# Altium PCB CM3_Board.PcbDoc
Units mm, origin at the board's own origin, x right, y up, seen from the top; angles counter-clockwise.
Board outline 80.15 x 57.15 mm, 4 copper layers (Component Side, Ground Plane, Power Plane, Solder Side), stack 1.717 mm thick; 83 components, 65 nets, 480 pads, 0 vias.
Unrouted connection lines stored in the file: 344.
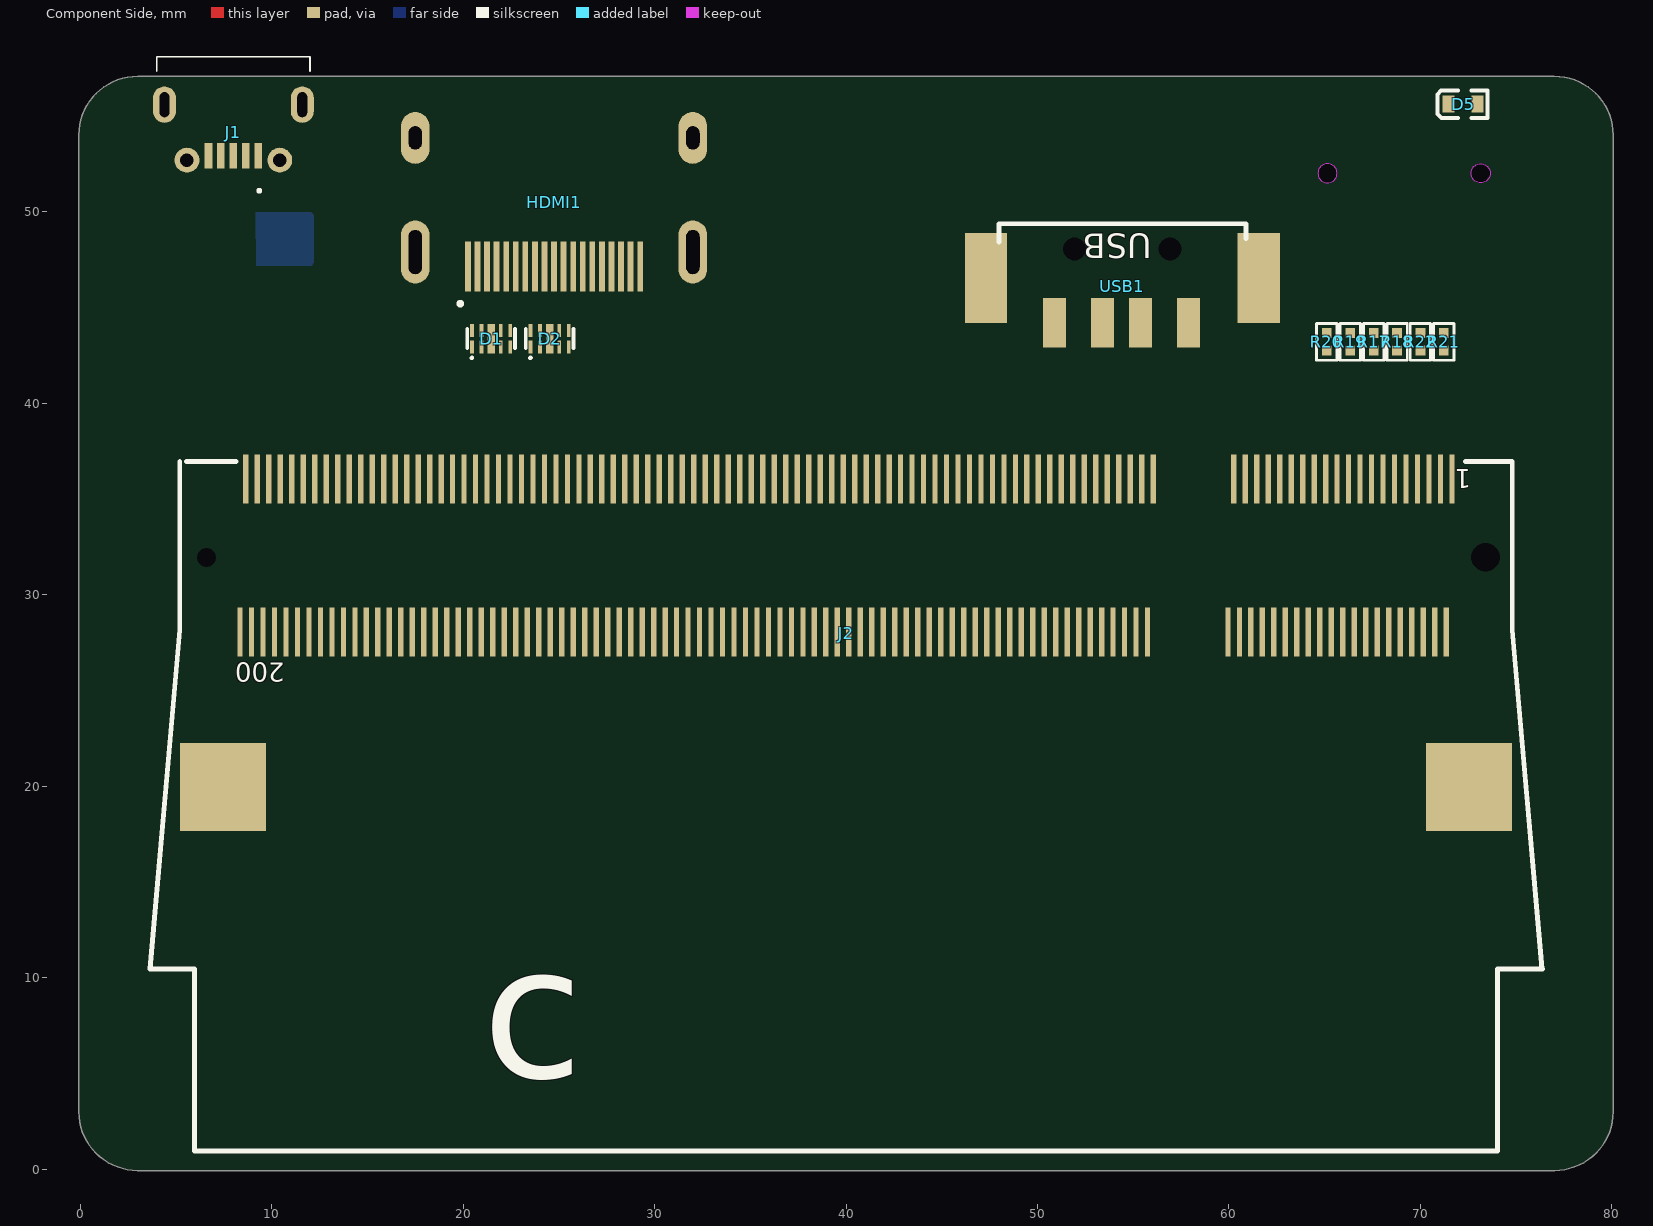
[diagram p0: Component Side view]
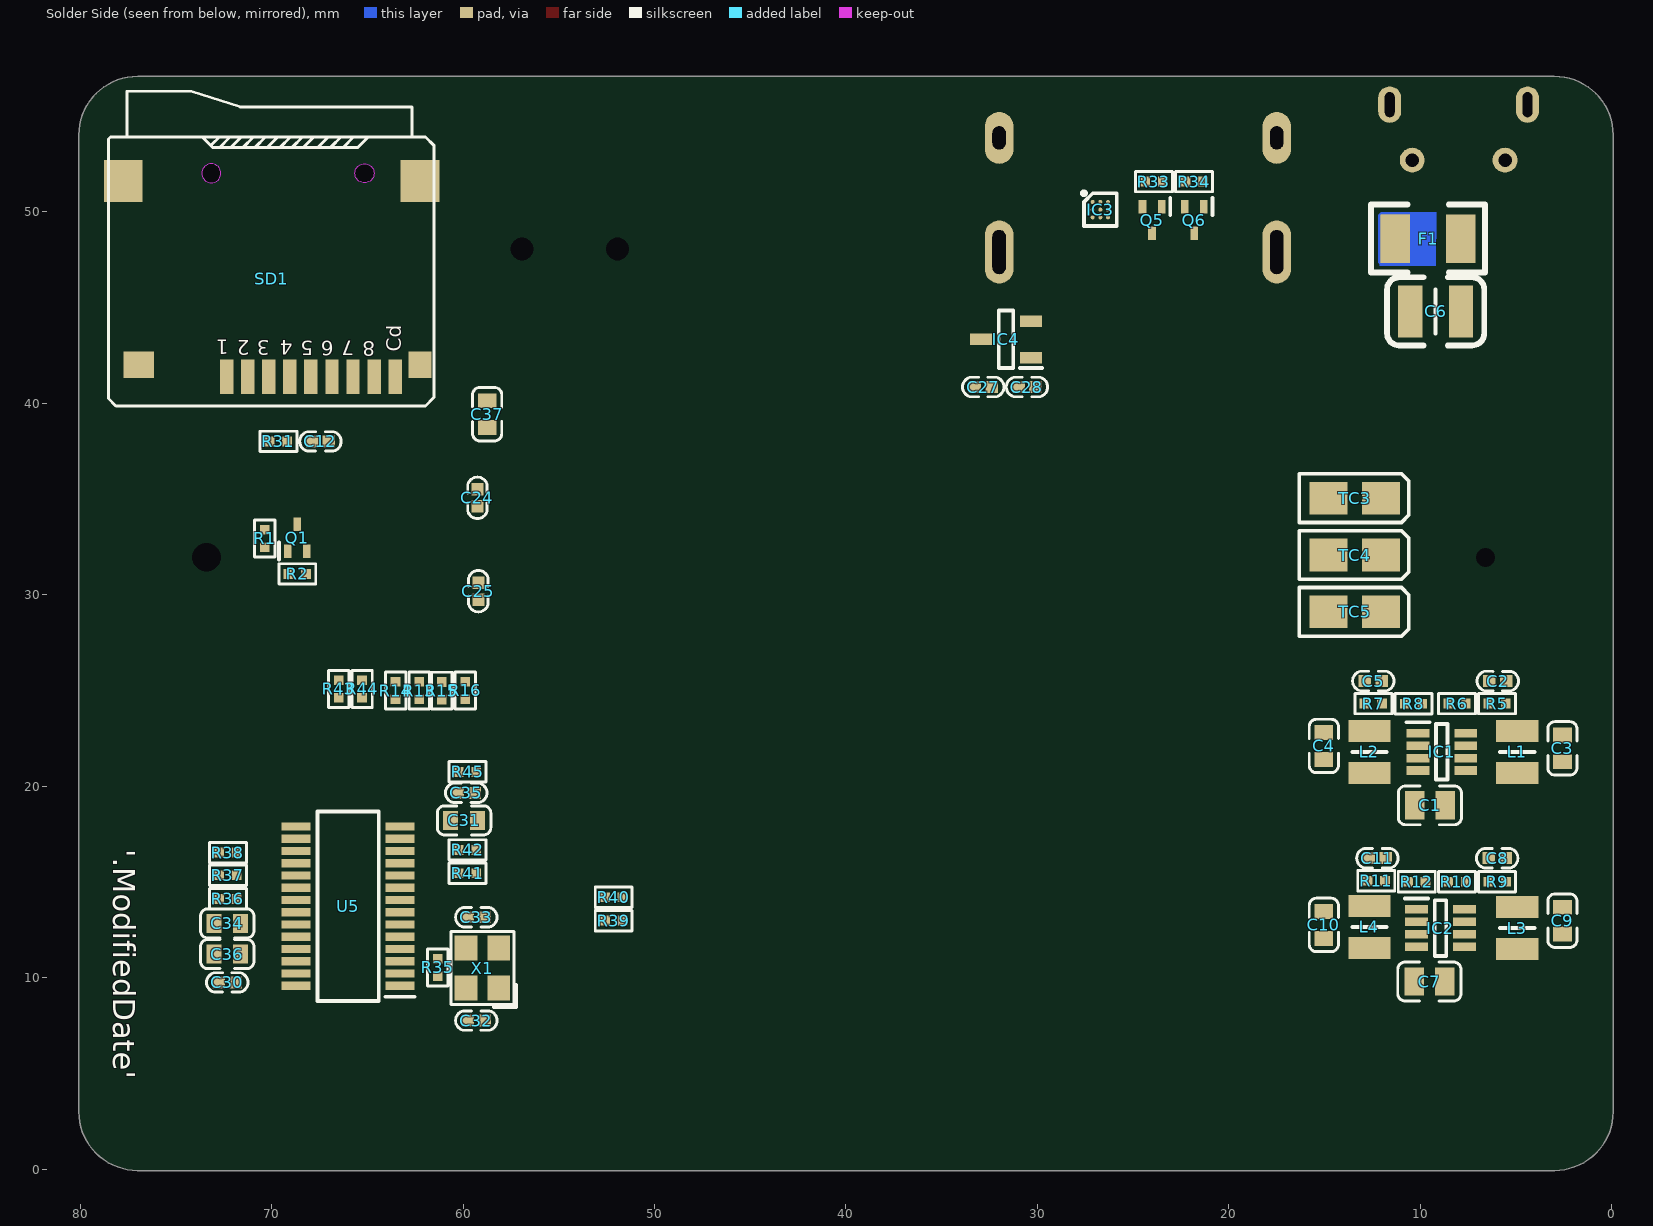
[diagram p1: Solder Side view, seen from below]
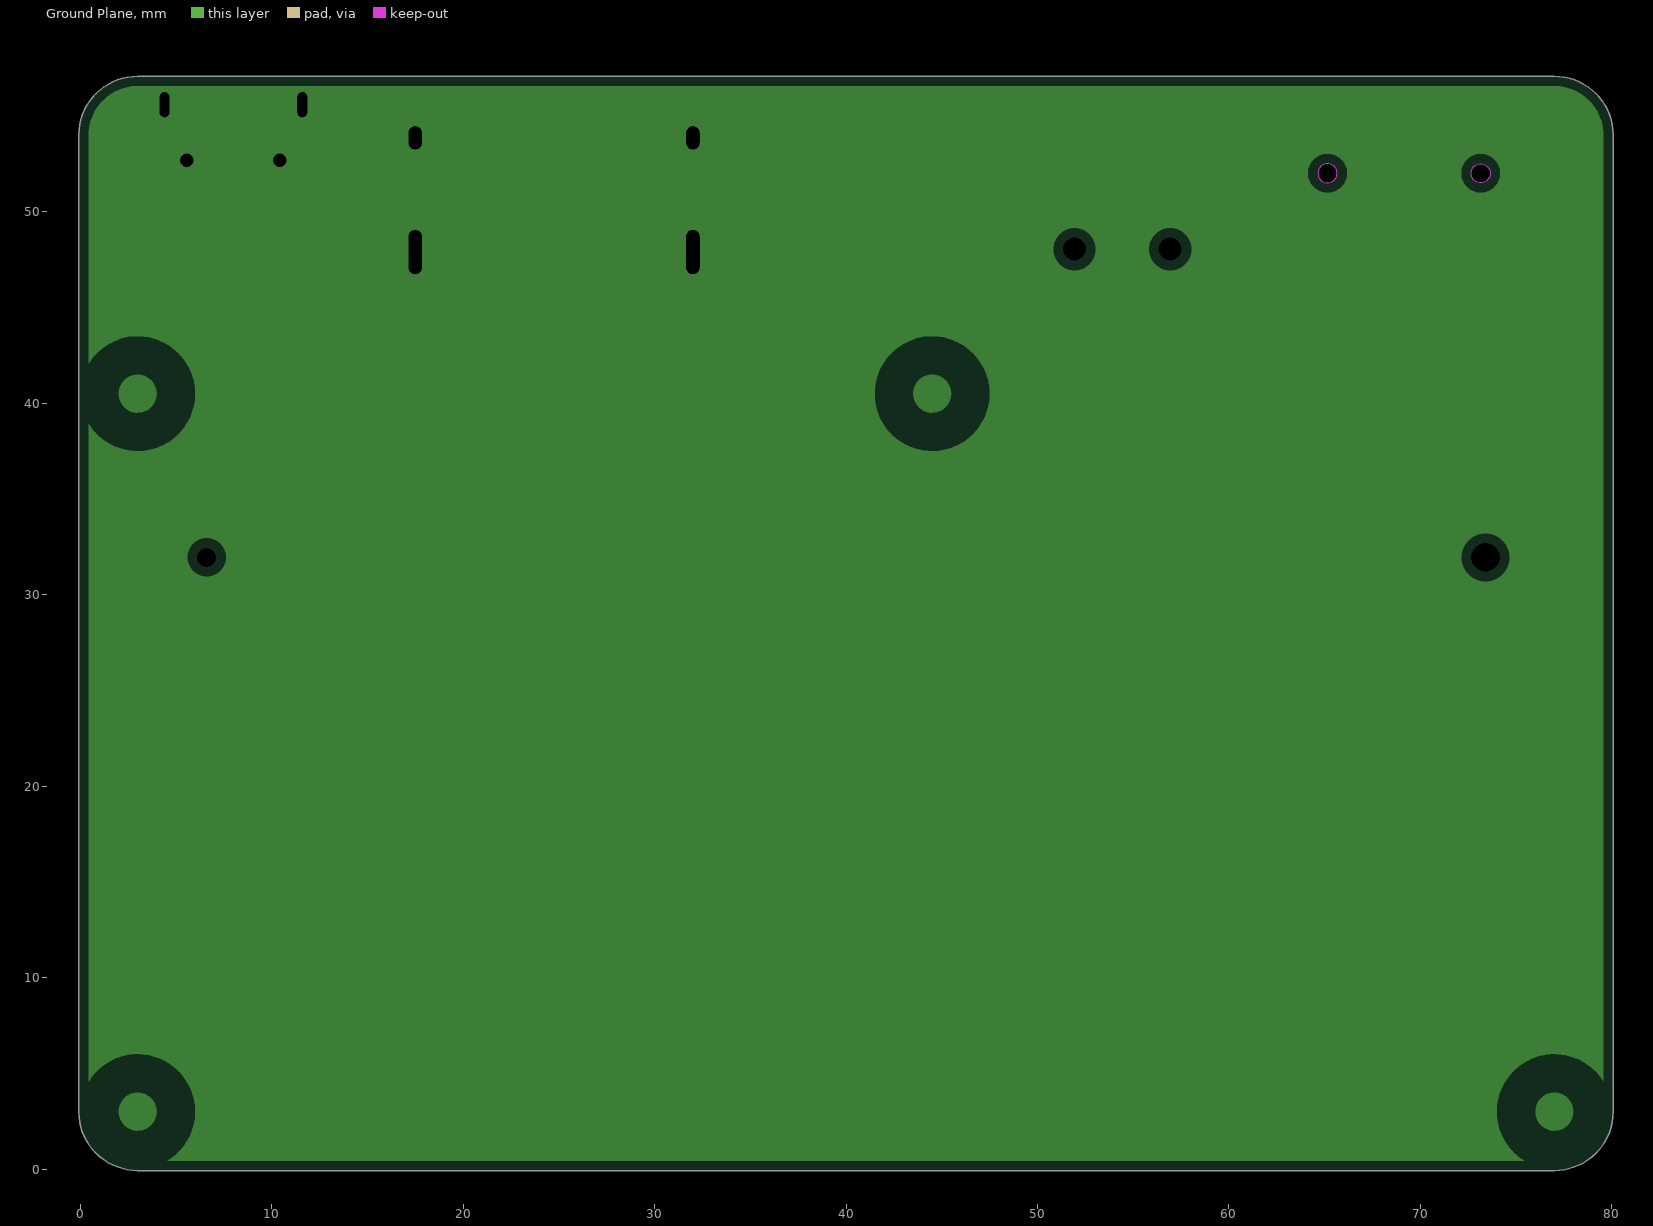
[diagram p2: Ground Plane, clearances drawn from the general rule]
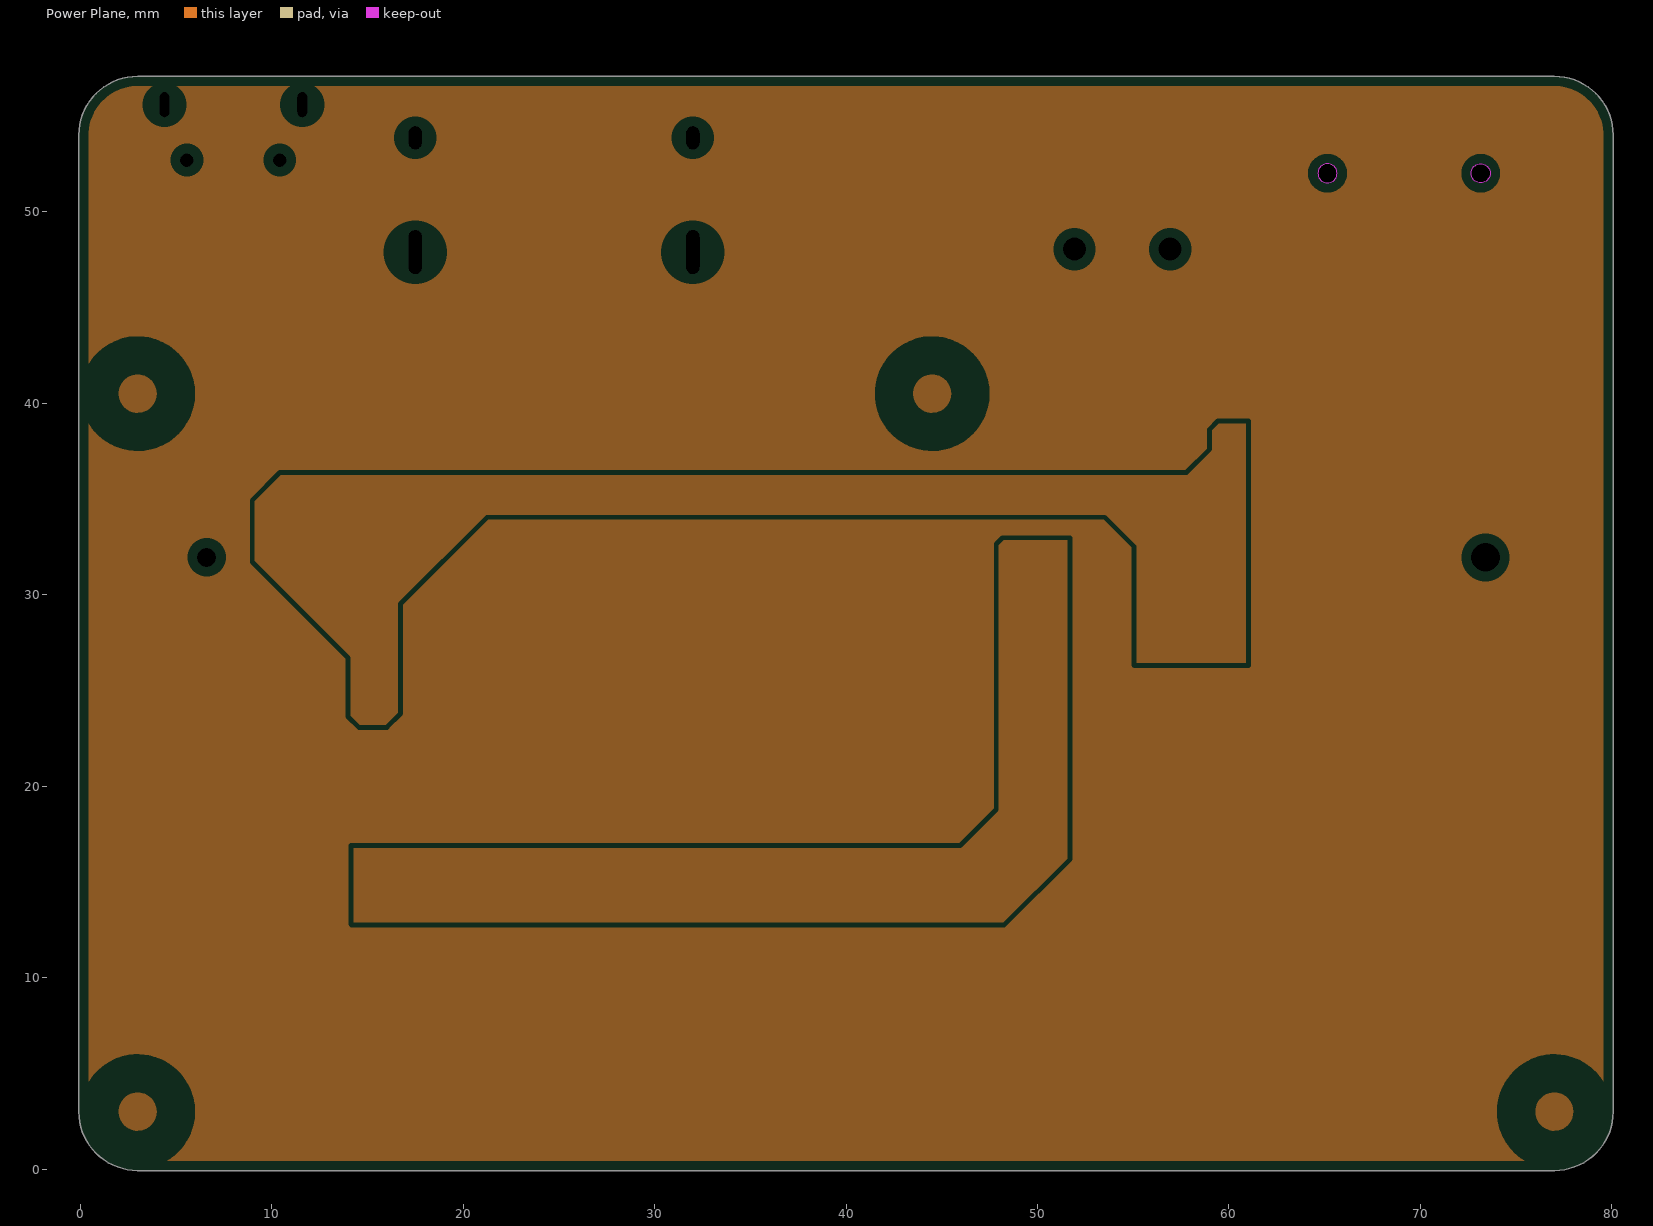
[diagram p3: Power Plane, clearances drawn from the general rule]

## Layer stack, top to bottom
Top Solder: solder mask 0.0102, Solder Resist, Dk 3.5
Component Side: signal copper 0.0356
Dielectric 1: core 0.32, FR-4, Dk 4.8
Ground Plane: plane copper 0.036, net GND
Dielectric 3: prepreg 1, Dk 4.2
Power Plane: plane copper 0.036, net (Multiple Nets)
Dielectric 4: core 0.254, Dk 4.2
Solder Side: signal copper 0.0356
Bottom Solder: solder mask 0.0102, Solder Resist, Dk 3.5

## Board outline
-0.075,2.987 ccw(c3,3) 2.987,-0.075 ccw(c3,0) 3,-0.076 77,-0.076 ccw(c77,0) 77.012,-0.075 ccw(c77,3) 80.075,2.988 ccw(c80,3) 80.076,3 80.076,54 ccw(c80,54) 80.075,54.012 ccw(c77,54) 77,57.075 ccw(c77,57) 76.999,57.075 44.37,57.075 3.001,57.075 ccw(c3,57) 3,57.075 ccw(c3,54) -0.075,54.012 ccw(c0,54) -0.076,54 -0.076,3 ccw(c0,3)

## Design rules (kind name [scope] priority, off if disabled: settings)
BoardOutlineClearance [All] p1: gap=0.6 ignorepadtopadclearanceinfootprint=FALSE
Clearance Clearance_1 [All] p1: gap=0.152 ignorepadtopadclearanceinfootprint=TRUE
DiffPairsRouting [All] p1: maxlimit=0.508 minlimit=0.203 mostfreqgap=0.203 toplayer_minwidth=0.127 toplayer_maxwidth=0.381 toplayer_prefwidth=0.203 bottomlayer_minwidth=0.127 bottomlayer_maxwidth=0.381 bottomlayer_prefwidth=0.203 maxuncoupledlength=12.7
FabricationTestPointUsage TestPointUsage [All] p1: valid=0 allowmultiple=FALSE
FabricationTestpoint Testpoint [All] p1: side=3 testpointundercomponent=TRUE minsize=1.016 maxsize=2.54 preferedsize=1.524 minholesize=0 maxholesize=1.016 preferedholesize=0.813 testpointgrid=0.025 allowsidetop=TRUE allowsidebottom=TRUE usegrid=TRUE gridtolerance=0
HoleSize [All] p1: absolutevalues=TRUE maxlimit=20 minlimit=0.025 maxpercent=80.000 minpercent=20.000
MinimumSolderMaskSliver [All] p1 off: minsoldermaskwidth=0.254
PlaneClearance [All] p1: clearance=0.508
PlaneConnect [All] p1: planeconnectstyle=Relief reliefexpansion=0.508 reliefentries=4 reliefconductorwidth=0.254 reliefairgap=0.254
PolygonConnect PolygonConnect_1 [All vs IsNamedPolygon('GND_L01_P002') Or IsNamedPolygon('GND_L04_P003')] p1: thpad.connectstyle=Relief thpad.reliefconductorwidth=0.254 thpad.reliefentries=4 thpad.polygonreliefangle="90 Angle" thpad.airgapwidth=0.254 smdpad.connectstyle=Relief smdpad.reliefconductorwidth=0.254 smdpad.reliefentries=4 smdpad.polygonreliefangle="90 Angle" smdpad.airgapwidth=0.254 via.connectstyle=Direct via.reliefconductorwidth=0.254 via.reliefentries=4 via.polygonreliefangle="90 Angle" via.airgapwidth=0.254
PolygonConnect [All] p2: connectstyle=Relief reliefconductorwidth=0.254 reliefentries=4 polygonreliefangle="90 Angle" airgapwidth=0.254
RoutingVias [All] p1: holewidth=0.25 width=0.4 viastyle="Through Hole" minholewidth=0.25 minwidth=0.4 maxholewidth=3 maxwidth=6
SilkToSilkClearance [All] p1 off: silktosilkclearance=0
SilkToSolderMaskClearance SilkscreenOverComponentPads [IsPad] p1 off: minsilkscreentomaskgap=0.254 clearancetoexposedcopper=TRUE
SolderMaskExpansion [All] p1: expansion=0.102 istentingtop=FALSE
Width [All] p1: maxlimit=10 minlimit=0.127 preferedwidth=0.152 minimp=50.000000 maximp=50.000000 favimp=50.000000
21 further rules are at their usual default settings.

## Classes and differential pairs
component class CM3-USBHub: C30 C31 C32 C33 C34 C35 C36 C37 R35 R36 R37 R38 R39 R40 R41 R42 R43 R44 R45 U5 USB1 X1
component class CM3-HDMI: C27 C28 D1 D2 D6 HDMI1 IC3 IC4 Q5 Q6 R33 R34 U3 U4
component class CM3-CON: C12 C24 C25 D5 J2 Q1 R1 R2 R13 R14 R15 R16 R17 R18 R19 R20 R21 R22 R31 SD1 TC3 TC4 TC5
component class CM3_Power: C1 C2 C3 C4 C5 C6 C7 C8 C9 C10 C11 F1 IC1 IC2 J1 L1 L2 L3 L4 R5 R6 R7 R8 R9 R10 R11 R12
differential pair HDMI_D2: +HDMI_D2_P -HDMI_D2_N
differential pair HDMI_D1: +HDMI_D1_P -HDMI_D1_N
differential pair HDMI_D0: +HDMI_D0_P -HDMI_D0_N
differential pair HDMI_CLK: +HDMI_CLK_P -HDMI_CLK_N
differential pair USB: +USB_P -USB_N
differential pair USB1: +USB1_P -USB1_N
differential pair DU: +DU_P -DU_N
differential pair D2: +D2_P -D2_N
differential pair D1: +D1_P -D1_N
differential pair CM3_USBD: +CM3_USBD_P -CM3_USBD_N

## Components (designator, comment, footprint, x,y, rotation, side; value= is the part's Value field where it differs from the comment)
C1 "10uF 10V" 0805C 9.5,19 r0 bottom
C2 "22pF 50V" 0402C 5.955,25.492 r180 bottom
C3 "22uF 6.3V" 0603C 2.581,21.974 r90 bottom
C4 "22uF 6.3V" 0603C 15.043,22.1 r90 bottom
C5 "22pF 50V" 0402C 12.454,25.492 r0 bottom
C6 "47uF 16V" 1210C 9.2,44.8 r180 bottom
C7 "10uF 10V" 0805C 9.528,9.795 r0 bottom
C8 "22pF 50V" 0402C 5.989,16.24 r180 bottom
C9 "22uF 6.3V" 0603C 2.581,12.975 r90 bottom
C10 "22uF 6.3V" 0603C 15.043,12.752 r90 bottom
C11 "22pF 50V" 0402C 12.243,16.239 r0 bottom
C12 "4.7uF 16V" 0402C 67.45,38.006 r0 bottom
C24 "100nF 16V" 0402C 59.25,35.061 r270 bottom
C25 "100nF 16V" 0402C 59.199,30.185 r270 bottom
C27 "100nF 16V" 0402C 32.831,40.85 r180 bottom
C28 "100nF 16V" 0402C 30.547,40.85 r180 bottom
C30 "100nF 16V" 0402C 72.319,9.746 r0 bottom
C31 "10uF 16V" 0603C 59.95,18.212 r0 bottom
C32 "20pF" 0402C 59.31,7.757 r0 bottom
C33 "20pF" 0402C 59.31,13.153 r0 bottom
C34 "10uF 16V" 0603C 72.319,12.831 r180 bottom
C35 "100nF 16V" 0402C 59.837,19.65 r0 bottom
C36 "10uF 16V" 0603C 72.319,11.23 r0 bottom
C37 "10uF 16V" 0603C 58.742,39.43 r90 bottom
D1 "RCLAMP0524P.TCT" RCLAMP0524P 21.963,43.374 r0 top
D2 "RCLAMP0524P.TCT" RCLAMP0524P 25.019,43.374 r0 top
D5 "LED" LED-0603G 72.994,55.626 r180 top
F1 "1.75A 6V" FUSE-1210 9.6,48.6 r0 bottom
HDMI1 "10029449-001RLF" HDMI-001 32,47.9 r180 top
IC1 "SY8029AIC" SOT65P280X110-8N 8.878,21.792 r180 bottom
IC2 "SY8029AIC" SOT65P280X110-8N 8.95,12.587 r180 bottom
IC3 "ESD5384NCTBG" BGA9C40P3X3_114X114X63 26.715,50.113 r180 bottom
IC4 "AP2331W-7" SOT95P285X130-3N 31.643,43.34 r0 bottom
J1 "U254-051T-4BHJ25-S2S" U254051T4BHJ25S2S 8,53.6 r180 top
J2 "SODIMM 200PIN DDR2" "SODIMM 200PIN - 5.2H" 40,28 r180 top locked
L1 "MLP2520H2R2ST0S1" INDC2520X100N 4.939,21.792 r90 bottom
L2 "MLP2520H2R2ST0S1" INDC2520X100N 12.66,21.792 r270 bottom
L3 "MLP2520H2R2ST0S1" INDC2520X100N 4.939,12.587 r90 bottom
L4 "MLP2520H2R2ST0S1" INDC2520X100N 12.66,12.645 r270 bottom
Q1 "DMG1012T" SOT523 68.66,33.079 r90 bottom
Q5 "DMG1012T" SOT523 24.016,49.471 r270 bottom
Q6 "DMG1012T" SOT523 21.815,49.471 r270 bottom
R1 "2k" 0402R 70.357,32.937 r270 bottom
R2 "100k" 0402R 68.66,31.083 r180 bottom
R5 "100k" 0402R 6.001,24.317 r180 bottom
R6 "49.9k" 0402R 8.086,24.317 r180 bottom
R7 "100k" 0402R 12.454,24.317 r0 bottom
R8 "22.2k" 0402R 10.363,24.303 r0 bottom
R9 "100k" 0402R 5.989,15.014 r180 bottom
R10 "31.6k" 0402R 8.088,15.014 r180 bottom
R11 "110k" 0402R 12.303,15.055 r0 bottom
R12 "20k" 0402R 10.189,15.014 r0 bottom
R13 "100k" 0402R 62.296,24.996 r270 bottom
R14 "100k" 0402R 63.531,24.996 r270 bottom
R15 "100k" 0402R 61.112,24.985 r270 bottom
R16 "100k" 0402R 59.885,25.003 r270 bottom
R17 "10k" 0402R 67.559,43.211 r90 top
R18 "10k" 0402R 68.783,43.211 r90 top
R19 "10k" 0402R 66.336,43.211 r90 top
R20 "10k" 0402R 65.113,43.211 r90 top
R21 "10k" 0402R 71.229,43.211 r90 top
R22 "10k" 0402R 70.006,43.211 r90 top
R31 "0R" 0402R 69.65,38.006 r0 bottom
R33 "100K" 0402R 23.916,51.583 r180 bottom
R34 "100K" 0402R 21.815,51.583 r0 bottom
R35 "1M" 0402R 61.327,10.535 r270 bottom
R36 "100K" 0402R 72.288,14.111 r0 bottom
R37 "100K" 0402R 72.289,15.351 r0 bottom
R38 "100K" 0402R 72.289,16.531 r0 bottom
R39 "22R" 0402R 52.134,12.979 r180 bottom
R40 "22R" 0402R 52.134,14.193 r180 bottom
R41 "22R" 0402R 59.764,15.452 r180 bottom
R42 "22R" 0402R 59.764,16.666 r180 bottom
R43 "22R" 0402R 66.495,25.076 r270 bottom
R44 "22R" 0402R 65.28,25.076 r270 bottom
R45 "2.7K" 0402R 59.764,20.745 r0 bottom
SD1 "MicroSD" "MICRO SD" 70,46.5 r0 bottom
TC3 "47uF 6.3V" TAJ-A/3216 14.8,35.049 r0 bottom
TC4 "47uF 6.3V" TAJ-A/3216 14.8,32.074 r0 bottom
TC5 "47uF 6.3V" TAJ-A/3216 14.8,29.099 r0 bottom
U5 "FE1.1S" SOP64P600X175-28N 66.009,13.733 r0 bottom
USB1 "USB-A" "USB_A/F-SMT 正向" 50.892,44.2 r180 top
X1 "12Mhz 20pF" "OSC 3225-4P" 58.987,10.502 r90 bottom

## Footprints (in the part's own frame and the unit in brackets; to place one, negate y for a bottom-side part, rotate by r counter-clockwise, add the part's x,y. Pads: shape width x height; smd on the part's side, far side on the other; paste and mask are expansions set on the pad)
0402C [mm]
  rect 0.65x0.62 smd: 1(-0.44,0) 2(0.44,0)
  silkscreen extent -1.08,-0.51 1.08,0.51, body extent -0.51,-0.25 0.49,0.25, height 0.55
0402R [mil]
  rect 20x20 smd: 1(-18,0) 2(18,0)
  silkscreen extent -38,-21 38,21, body extent -20,-11 20,11, height 16
0603C [mm]
  rect 0.78x0.98 smd: 1(-0.7,0) 2(0.7,0)
  silkscreen extent -1.4,-0.76 1.4,0.76, body extent -0.8,-0.4 0.8,0.4, height 0.87
0805C [mm]
  rect 1.02x1.47 smd: 1(-0.8,0) 2(0.8,0)
  silkscreen extent -1.65,-1.02 1.65,1.02, body extent -1,-0.62 1,0.63, height 0.88
1210C [mm]
  rect 1.26x2.72 smd: 1(-1.33,0) 2(1.33,0)
  silkscreen extent -2.54,-1.78 2.54,1.78, body extent -1.6,-1.25 1.6,1.25, height 2.7
BGA9C40P3X3_114X114X63 [mm]
  round 0.212 smd: A1(-0.4,0.4) A2(0,0.4) A3(0.4,0.4) B1(-0.4,0) B2(0,0) B3(0.4,0) C1(-0.4,-0.4) C2(0,-0.4) C3(0.4,-0.4)
  silkscreen extent -0.96,-0.86 0.86,0.96, body extent -0.57,-0.57 0.57,0.57, height 0.63
FUSE-1210 [mil]
  rect 60x100 smd: 1(-67.5,0) 2(67.5,0)
  silkscreen extent -118,-70 118,70, body extent -58,-51 69,51, height 27
HDMI-001 [mm]
  rect 0.3x2.6 smd: 1(11.75,0.76) 2(11.25,0.76) 3(10.75,0.76) 4(10.25,0.76) 5(9.75,0.76) 6(9.25,0.76) 7(8.75,0.76) 8(8.25,0.76) 9(7.75,0.76) 10(7.25,0.76) 11(6.75,0.76) 12(6.25,0.76) 13(5.75,0.76) 14(5.25,0.76) 15(4.75,0.76) 16(4.25,0.76) 17(3.75,0.76) 18(3.25,0.76) 19(2.75,0.76)
  oval 1.5x2.7 hole 1.2 slot 0.7 at 0 deg: 20(0,-5.96) 23(14.5,-5.96)
  oval 1.5x3.3 hole 2.3 slot 0.7 at 0 deg: 21(0,0) 22(14.5,0)
  silkscreen extent 12.1,2.65 12.2,2.75, body extent -0.26,-10.16 14.74,1.84, height 5.98
INDC2520X100N [mm]
  rect 1.15x2.2 smd: 1(-1.1,0) 2(1.1,0)
  silkscreen extent 0,-0.9 0,0.9, body extent -1.25,-1.1 1.25,0.9, height 1
LED-0603G [mil]
  rect 25x35 smd: A(0,0) K(60,0)
  silkscreen extent -20,-28 83,28, body extent -1,-17 61,15, height 24
"MICRO SD" [mm]
  rect 1.6x1.4 smd: 0(6.95,4.487)
  rect 0.7x1.8 smd: 1(2.35,5.114) 2(1.25,5.114) 3(0.15,5.114) 4(-0.95,5.114) 5(-2.05,5.114) 6(-3.15,5.114) 7(-4.25,5.114) 8(-5.35,5.114) 9(-6.45,5.114)
  rect 1.2x1.4 smd: 10(-7.75,4.487)
  rect 2.032x2.2 smd: 11(-7.75,-5.114) 12(7.75,-5.114)
  Keep-Out Layer board cut-out: -4.85,-6.013 -5.041,-5.975 -5.204,-5.867 -5.312,-5.705 -5.35,-5.513 -5.35,-5.513 -5.312,-5.322 -5.204,-5.16 -5.041,-5.052 -4.85,-5.013 -4.85,-5.013 -4.659,-5.052 -4.496,-5.16 -4.388,-5.322 -4.35,-5.513 -4.35,-5.513 -4.388,-5.705 -4.496,-5.867 -4.659,-5.975 -4.85,-6.013
  Keep-Out Layer board cut-out: 2.65,-5.513 2.688,-5.705 2.796,-5.867 2.959,-5.975 3.15,-6.013 3.15,-6.013 3.341,-5.975 3.504,-5.867 3.612,-5.705 3.65,-5.513 3.65,-5.513 3.612,-5.322 3.504,-5.16 3.341,-5.052 3.15,-5.013 3.15,-5.013 2.959,-5.052 2.796,-5.16 2.688,-5.322 2.65,-5.513
  silkscreen extent -8.47,-9.8 8.52,6.64, body extent -8,-11.97 8.27,5.4, height 1.8
"OSC 3225-4P" [mm]
  rect 1.3x1.2 smd: 1(-1.05,-0.85) 2(1.05,-0.85) 3(1.05,0.85) 4(-1.05,0.85)
  silkscreen extent -2.03,-1.75 1.91,1.65, body extent -1.6,-1.25 1.6,1.25, height 0.7
RCLAMP0524P [mm]
  rect 0.2x0.675 smd: 1(-1.5,-0.437) 2(-1,-0.438) 4(0,-0.437) 5(0.5,-0.437) 6(0.5,0.437) 7(0,0.437) 9(-1,0.437) 10(-1.5,0.437)
  rect 0.4x0.775 smd: 3(-0.5,-0.387) 8(-0.5,0.387)
  silkscreen extent -1.75,-1.02 0.75,0.5
"SODIMM 200PIN - 5.2H" [mm] "200 位 SODIMM DDR2 SDRAM 表面贴装"
  round 1.4 hole 1.5 unplated: 0(-33.4,-3.95)
  rect 4.5x4.6 smd: 0(-32.55,8.05) 0(32.55,8.05)
  round 0.9 hole 1 unplated: 0(33.4,-3.95)
  rect 0.279x2.55 smd: 1(-31.65,-8.05) 2(-31.35,-0.05) 3(-31.05,-8.05) 4(-30.75,-0.05) 5(-30.45,-8.05) 6(-30.15,-0.05) 7(-29.85,-8.05) 8(-29.55,-0.05) 9(-29.25,-8.05) 10(-28.95,-0.05) 11(-28.65,-8.05) 12(-28.35,-0.05) 13(-28.05,-8.05) 14(-27.75,-0.05) 15(-27.45,-8.05) 16(-27.15,-0.05) 17(-26.85,-8.05) 18(-26.55,-0.05) 19(-26.25,-8.05) 20(-25.95,-0.05) 21(-25.65,-8.05) 22(-25.35,-0.05) 23(-25.05,-8.05) 24(-24.75,-0.05) 25(-24.45,-8.05) 26(-24.15,-0.05) 27(-23.85,-8.05) 28(-23.55,-0.05) 29(-23.25,-8.05) 30(-22.95,-0.05) 31(-22.65,-8.05) 32(-22.35,-0.05) 33(-22.05,-8.05) 34(-21.75,-0.05) 35(-21.45,-8.05) 36(-21.15,-0.05) 37(-20.85,-8.05) 38(-20.55,-0.05) 39(-20.25,-8.05) 40(-19.95,-0.05) 41(-16.05,-8.05) 42(-15.75,-0.05) 43(-15.45,-8.05) 44(-15.15,-0.05) 45(-14.85,-8.05) 46(-14.55,-0.05) 47(-14.25,-8.05) 48(-13.95,-0.05) 49(-13.65,-8.05) 50(-13.35,-0.05) 51(-13.05,-8.05) 52(-12.75,-0.05) 53(-12.45,-8.05) 54(-12.15,-0.05) 55(-11.85,-8.05) 56(-11.55,-0.05) 57(-11.25,-8.05) 58(-10.95,-0.05) 59(-10.65,-8.05) 60(-10.35,-0.05) 61(-10.05,-8.05) 62(-9.75,-0.05) 63(-9.45,-8.05) 64(-9.15,-0.05) 65(-8.85,-8.05) 66(-8.55,-0.05) 67(-8.25,-8.05) 68(-7.95,-0.05) 69(-7.65,-8.05) 70(-7.35,-0.05) 71(-7.05,-8.05) 72(-6.75,-0.05) 73(-6.45,-8.05) 74(-6.15,-0.05) 75(-5.85,-8.05) 76(-5.55,-0.05) 77(-5.25,-8.05) 78(-4.95,-0.05) 79(-4.65,-8.05) 80(-4.35,-0.05) 81(-4.05,-8.05) 82(-3.75,-0.05) 83(-3.45,-8.05) 84(-3.15,-0.05) 85(-2.85,-8.05) 86(-2.55,-0.05) 87(-2.25,-8.05) 88(-1.95,-0.05) 89(-1.65,-8.05) 90(-1.35,-0.05) 91(-1.05,-8.05) 92(-0.75,-0.05) 93(-0.45,-8.05) 94(-0.15,-0.05) 95(0.15,-8.05) 96(0.45,-0.05) 97(0.75,-8.05) 98(1.05,-0.05) 99(1.35,-8.05) 100(1.65,-0.05) 101(1.95,-8.05) 102(2.25,-0.05) 103(2.55,-8.05) 104(2.85,-0.05) 105(3.15,-8.05) 106(3.45,-0.05) 107(3.75,-8.05) 108(4.05,-0.05) 109(4.35,-8.05) 110(4.65,-0.05) 111(4.95,-8.05) 112(5.25,-0.05) 113(5.55,-8.05) 114(5.85,-0.05) 115(6.15,-8.05) 116(6.45,-0.05) 117(6.75,-8.05) 118(7.05,-0.05) 119(7.35,-8.05) 120(7.65,-0.05) 121(7.95,-8.05) 122(8.25,-0.05) 123(8.55,-8.05) 124(8.85,-0.05) 125(9.15,-8.05) 126(9.45,-0.05) 127(9.75,-8.05) 128(10.05,-0.05) 129(10.35,-8.05) 130(10.65,-0.05) 131(10.95,-8.05) 132(11.25,-0.05) 133(11.55,-8.05) 134(11.85,-0.05) 135(12.15,-8.05) 136(12.45,-0.05) 137(12.75,-8.05) 138(13.05,-0.05) 139(13.35,-8.05) 140(13.65,-0.05) 141(13.95,-8.05) 142(14.25,-0.05) 143(14.55,-8.05) 144(14.85,-0.05) 145(15.15,-8.05) 146(15.45,-0.05) 147(15.75,-8.05) 148(16.05,-0.05) 149(16.35,-8.05) 150(16.65,-0.05) 151(16.95,-8.05) 152(17.25,-0.05) 153(17.55,-8.05) 154(17.85,-0.05) 155(18.15,-8.05) 156(18.45,-0.05) 157(18.75,-8.05) 158(19.05,-0.05) 159(19.35,-8.05) 160(19.65,-0.05) 161(19.95,-8.05) 162(20.25,-0.05) 163(20.55,-8.05) 164(20.85,-0.05) 165(21.15,-8.05) 166(21.45,-0.05) 167(21.75,-8.05) 168(22.05,-0.05) 169(22.35,-8.05) 170(22.65,-0.05) 171(22.95,-8.05) 172(23.25,-0.05) 173(23.55,-8.05) 174(23.85,-0.05) 175(24.15,-8.05) 176(24.45,-0.05) 177(24.75,-8.05) 178(25.05,-0.05) 179(25.35,-8.05) 180(25.65,-0.05) 181(25.95,-8.05) 182(26.25,-0.05) 183(26.55,-8.05) 184(26.85,-0.05) 185(27.15,-8.05) 186(27.45,-0.05) 187(27.75,-8.05) 188(28.05,-0.05) 189(28.35,-8.05) 190(28.65,-0.05) 191(28.95,-8.05) 192(29.25,-0.05) 193(29.55,-8.05) 194(29.85,-0.05) 195(30.15,-8.05) 196(30.45,-0.05) 197(30.75,-8.05) 198(31.05,-0.05) 199(31.35,-8.05) 200(31.65,-0.05)
  silkscreen extent -36.38,-8.95 36.35,27.05, body extent -35.75,-8.75 35.75,17.8, height 5.26
SOP64P600X175-28N [mm]
  rect 1.525x0.44 smd: 1(-2.712,4.16) 2(-2.712,3.52) 3(-2.712,2.88) 4(-2.712,2.24) 5(-2.712,1.6) 6(-2.712,0.96) 7(-2.712,0.32) 8(-2.712,-0.32) 9(-2.712,-0.96) 10(-2.712,-1.6) 11(-2.712,-2.24) 12(-2.712,-2.88) 13(-2.712,-3.52) 14(-2.712,-4.16) 15(2.712,-4.16) 16(2.712,-3.52) 17(2.712,-2.88) 18(2.712,-2.24) 19(2.712,-1.6) 20(2.712,-0.96) 21(2.712,-0.32) 22(2.712,0.32) 23(2.712,0.96) 24(2.712,1.6) 25(2.712,2.24) 26(2.712,2.88) 27(2.712,3.52) 28(2.712,4.16)
  silkscreen extent -3.47,-4.95 1.6,4.95, body extent -3,-4.95 3,4.95, height 1.75
SOT65P280X110-8N [mm]
  rect 1.2x0.45 smd: 1(-1.25,0.975) 2(-1.25,0.325) 3(-1.25,-0.325) 4(-1.25,-0.975) 5(1.25,-0.975) 6(1.25,-0.325) 7(1.25,0.325) 8(1.25,0.975)
  silkscreen extent -1.85,-1.45 0.3,1.55, body extent -1.4,-1.45 1.4,1.45, height 1.1
SOT95P285X130-3N [mm]
  rect 1.15x0.6 smd: 1(-1.3,0.95) 2(-1.3,-0.95) 3(1.3,0)
  silkscreen extent -1.88,-1.5 0.38,1.5, body extent -1.43,-1.5 1.43,1.5, height 1.3
SOT523 [mm]
  rect 0.7x0.4 smd: D(0.6,0) G(-0.8,0.5) S(-0.8,-0.5)
  silkscreen extent -1.25,0.95 -0.35,0.95, body extent -0.93,-0.8 0.67,0.8, height 0.8
TAJ-A/3216 [mm]
  rect 2x1.7 smd: 1(-2.747,0) 2(0,0)
  silkscreen extent -4.19,-1.27 1.52,1.27, body extent -3,-0.8 0.2,0.8, height 1.6
U254051T4BHJ25S2S [mm]
  rect 0.4x1.35 smd: 1(-1.3,0.675) 2(-0.65,0.675) 3(0,0.675) 4(0.65,0.675) 5(1.3,0.675)
  oval 1.2x1.9 hole 1.3 slot 0.5 at 0 deg: MH1(-3.6,-2) MH2(3.6,-2)
  round 1.3 hole 0.7: MH3(2.425,0.9) MH4(-2.425,0.9)
  silkscreen extent -4,-4.5 4,2.55, body extent -4,-4.5 4,1.1, height 2.8
"USB_A/F-SMT 正向" [mm] "U-A-24SS-Y-1"
  rect 2.2x4.7 smd: 0(-10.668,-2.35) 0(3.582,-2.35)
  round 1.1 hole 1.2 unplated: 0(-6.043,-3.85) 0(-1.043,-3.85)
  rect 1.2x2.6 smd: 1(-7,0) 2(-4.5,0) 3(-2.5,0) 4(0,0)
  silkscreen extent -9.99,-5.18 2.91,-4.21, body extent -12.05,-13.93 5.21,1.23, height 7.81

## Part data
C1 C2 C3 C4 C5 C6 C7 C8 C9 C10 C11 C12 C24 C25 C32 C33 C37: library part CAP-NP
C27 C28: library part CAP
C30 C31 C34 C35 C36: library part CAP-NP, "CAP-NP"
D1 D2: "Diode", Manufacturer_Name=SEMTECH, Mouser Part Number=947-RCLAMP0524P.TCT, Arrow Part Number=RCLAMP0524P.TCT, Arrow Price/Stock=https://www.arrow.com/en/products/rclamp0524p.tct/semtech, Datasheet Link=http://www.semtech.com/images/datasheet/rclamp0522p_0524p.pdf, Manufacturer_Part_Number=RCLAMP0524P.TCT, Mouser Price/Stock=https://www.mouser.co.uk/ProductDetail/Semtech/RCLAMP0524PTCT?qs=rBWM4%252BvDhIdgSxIzr%252B4z8Q%3D%3D
D5: "绿色"
F1: library part FUSE
HDMI1: "HDMI Connector", Manufacturer_Name=Amphenol, Mouser Part Number=649-10029449-001RLF, RS Part Number=7710094, Allied_Number=70247646, Allied Price/Stock=https://www.alliedelec.com/amphenolicc-10029449-001rlf/70247646/, Datasheet Link=https://cdn.amphenol-icc.com/media/wysiwyg/files/drawing/10029449.pdf, Height=6.3mm, Manufacturer_Part_Number=10029449-001RLF, Mouser Price/Stock=https://www.mouser.com/Search/Refine.aspx?Keyword=649-10029449-001RLF, RS Price/Stock=http://uk.rs-online.com/web/p/products/7710094
IC1 IC2: "Integrated Circuit", Manufacturer_Name="Silergy Corp", Datasheet Link=https://datasheet.lcsc.com/szlcsc/Silergy-Corp-SY8029AIC_C207636.pdf, Height=1.1mm, Manufacturer_Part_Number=SY8029AIC
IC3: "Integrated Circuit", Manufacturer_Name="ON Semiconductor", Mouser Part Number=863-ESD5384NCTBG, RS Part Number=8010213P, Allied Price/Stock=http://www.alliedelec.com/on-semiconductor-esd5384nctbg/70466034/, Allied_Number=70466034, Datasheet Link=http://www.onsemi.com/pub/Collateral/ESD5384-D.PDF, Height=0.63mm, Manufacturer_Part_Number=ESD5384NCTBG, Mouser Price/Stock=https://www.mouser.com/Search/Refine.aspx?Keyword=863-ESD5384NCTBG, RS Price/Stock=http://uk.rs-online.com/web/p/products/8010213P
IC4: "Integrated Circuit", Manufacturer_Name="Diodes Inc.", Mouser Part Number=621-AP2331W-7, RS Part Number=8287665P, Datasheet Link=https://componentsearchengine.com/Datasheets/1/AP2331W-7.pdf, Height=1.3mm, Manufacturer_Part_Number=AP2331W-7, Mouser Price/Stock=https://www.mouser.com/Search/Refine.aspx?Keyword=621-AP2331W-7, RS Price/Stock=http://uk.rs-online.com/web/p/products/8287665P
J1: "Connector", Manufacturer_Name="XKB Enterprise", Datasheet Link=https://datasheet.lcsc.com/szlcsc/2002271812_XKB-Enterprise-U254-051T-4BHJ25-S2S_C319163.pdf, Height=2.9mm, Manufacturer_Part_Number=U254-051T-4BHJ25-S2S
J2: library part RPi-CM3
L1: library part MLP2520K1R0MT0S1, "Inductor", Manufacturer_Name=TDK, Mouser Part Number=810-MLP2520K1R0MT0S1, Supplier Part Number 1=445-15738-1-ND, Arrow Part Number=MLP2520K1R0MT0S1, Arrow Price/Stock=https://www.arrow.com/en/products/mlp2520k1r0mt0s1/tdk, Datasheet Link=https://www.arrow.com/en/products/mlp2520k1r0mt0s1/tdk, Height=1mm, Manufacturer_Part_Number=MLP2520K1R0MT0S1, Mouser Price/Stock=https://www.mouser.com/Search/Refine.aspx?Keyword=810-MLP2520K1R0MT0S1, Supplier 1=Digi-Key
L2 L3 L4: library part MLP2520K1R0MT0S1, "Inductor", Manufacturer_Name=TDK, Mouser Part Number=810-MLP2520K1R0MT0S1, Arrow Part Number=MLP2520K1R0MT0S1, Arrow Price/Stock=https://www.arrow.com/en/products/mlp2520k1r0mt0s1/tdk, Datasheet Link=https://www.arrow.com/en/products/mlp2520k1r0mt0s1/tdk, Height=1mm, Manufacturer_Part_Number=MLP2520K1R0MT0S1, Mouser Price/Stock=https://www.mouser.com/Search/Refine.aspx?Keyword=810-MLP2520K1R0MT0S1
Q1 Q5 Q6: library part N-MOS, "N沟道场效应管"
R1 R2 R5 R6 R7 R8 R9 R10 R11 R12 R13 R14 R15 R16 R17 R18 R19 R20 R21 R22 R31 R33 R34 R35 R36 R37 R38 R39 R40 R41 R42 R43 R44 R45: library part RES
SD1: "佐田", ComponentLink1Description=taobao.com, ComponentLink1URL=https://detail.tmall.com/item.htm?id=44131369945&spm=a1z09.2.0.0.73b72e8dl9KedD&_u=am2gus40e9e
TC3 TC4 TC5: library part TCAP
U5: "Integrated Circuit", Manufacturer_Name="JFD IC", Datasheet Link=https://cdn-shop.adafruit.com/product-files/2991/FE1.1s+Data+Sheet+(Rev.+1.0).pdf, Height=1.75mm, Manufacturer_Part_Number=FE1.1S
X1: library part XTAL-4P, "XTAL-4P"

## Nets (pads, with @x,y where several pads share a name; then routed paths per layer and width w, separated by ;. In a path a pad name is that pad's centre, name@x,y a point inside that pad or via, vN(x,y) a via of type N, cw(c..) or ccw(c..) an arc to the next point about the centre after c; other vN are vias at no path point)
1V8: C2.2 C3.2 J2.183 J2.184 J2.185 J2.186 L1.2 R2.2 R5.2 R34.2 TC3.1
2V5: C8.2 C9.2 J2.189 J2.190 L3.2 R9.2
3V3: C4.2 C5.2 C24.2 C25.2 D5.A J2.39 J2.40 J2.41 J2.42 J2.191 J2.192 J2.193 J2.194 L2.1 R7.2 R31.2 R33.2 TC4.1
3V9: C10.2 C11.2 L4.1 R11.2
5V: C1.1 C6.2 C7.1 C27.1 C34.2 C37.2 F1.1 IC1.2 IC1.6 IC1.7 IC2.2 IC2.6 IC2.7 IC4.3 J2.197 J2.198 J2.199 J2.200 TC5.1 U5.20 USB1.1
CEC: HDMI1.13 IC3.A2 Q5.D
CM3_USBD_N: J2.167 R44.1
CM3_USBD_P: J2.165 R43.1
D1_N: R41.1 U5.10
D1_P: R42.1 U5.11
D2_N: R39.1 U5.8
D2_P: R40.1 U5.9
DU_N: R44.2 U5.15
DU_P: R43.2 U5.16
EMMC_EN_N_1V8: J2.90 Q1.G R2.1
GND: C1.2 C3.1 C4.1 C6.1 C7.2 C9.1 C10.1 C12.1 C24.1 C25.1 C27.2 C28.2 C30.2 C31.1 C32.2 C33.1 C34.1 C35.1 C36.2 C37.1 D1.3 D1.8 D2.3 D2.8 HDMI1.2 HDMI1.5 HDMI1.8 HDMI1.11 HDMI1.14 HDMI1.17 HDMI1.20 HDMI1.21 HDMI1.22 HDMI1.23 IC1.4 IC2.4 IC3.B2 IC3.C2 IC4.1 J1.5 J1.MH1 J1.MH2 J1.MH3 J1.MH4 J2.1 J2.7 J2.8 J2.13 J2.14 J2.19 J2.20 J2.25 J2.26 J2.31 J2.32 J2.37 J2.38 J2.43 J2.44 J2.49 J2.50 J2.55 J2.56 J2.61 J2.62 J2.67 J2.68 J2.73 J2.74 J2.79 J2.80 J2.85 J2.86 J2.91 J2.92 J2.97 J2.98 J2.103 J2.104 J2.109 J2.110 J2.115 J2.116 J2.121 J2.122 J2.127 J2.133 J2.134 J2.139 J2.140 J2.145 J2.146 J2.151 J2.152 J2.157 J2.163 J2.164 J2.169 J2.170 J2.181 J2.182 J2.187 J2.188 J2.195 J2.196 Q1.S Q6.S R6.1 R8.1 R10.1 R12.1 R13.2 R14.2 R15.2 R16.2 R45.1 SD1.0 SD1.6 SD1.10 SD1.11 SD1.12 TC3.2 TC4.2 TC5.2 U5.1 USB1.4 X1.2 X1.4
GPIO4: J2.15
HDMI-5V: C28.1 HDMI1.18 IC3.A1 IC3.C1 IC4.2 Q5.G
HDMI_CEC: J2.171 Q5.S R33.1
HDMI_CLK_N: D2.5 D2.6 HDMI1.12 J2.111
HDMI_CLK_P: D2.4 D2.7 HDMI1.10 J2.113
HDMI_D0_N: D2.2 D2.9 HDMI1.9 J2.117
HDMI_D0_P: D2.1 D2.10 HDMI1.7 J2.119
HDMI_D1_N: D1.5 D1.6 HDMI1.6 J2.123
HDMI_D1_P: D1.4 D1.7 HDMI1.4 J2.125
HDMI_D2_N: D1.2 D1.9 HDMI1.3 J2.129
HDMI_D2_P: D1.1 D1.10 HDMI1.1 J2.131
HDMI_HPD: J2.88 Q6.D R34.1
HDMI_SCL: HDMI1.15 IC3.A3 J2.175
HDMI_SDA: HDMI1.16 IC3.B3 J2.173
HPD: HDMI1.19 IC3.C3 Q6.G
HUB_1V8: C30.1 C31.2 U5.12 U5.28
HUB_3V3: C35.2 C36.1 R36.2 R37.2 R38.2 U5.13 U5.21 U5.26
NetC2_1: C2.1 IC1.8 R5.1 R6.2
NetC5_1: C5.1 IC1.1 R7.1 R8.2
NetC8_1: C8.1 IC2.8 R9.1 R10.2
NetC11_1: C11.1 IC2.1 R11.1 R12.2
NetC32_1: C32.1 R35.2 U5.2 X1.1
NetC33_2: C33.2 R35.1 U5.3 X1.3
NetD5_K: D5.K R1.1
NetF1_2: F1.2 J1.1
NetIC1_3: IC1.3 L2.2
NetIC1_5: IC1.5 L1.1
NetIC2_3: IC2.3 L4.2
NetIC2_5: IC2.5 L3.1
NetJ2_28: J2.28 R14.1
NetJ2_30: J2.30 R13.1
NetJ2_82: J2.82 R16.1
NetJ2_84: J2.84 R15.1
NetQ1_D: Q1.D R1.2
NetR36_1: R36.1 U5.19
NetR37_1: R37.1 U5.18
NetR38_1: R38.1 U5.17
NetR45_2: R45.2 U5.14
SDX_CLK: J2.10 R17.1 SD1.5
SDX_CMD: J2.12 R18.1 SD1.3
SDX_D0: J2.16 R19.1 SD1.7
SDX_D1: J2.18 R20.1 SD1.8
SDX_D2: J2.22 R21.1 SD1.1
SDX_D3: J2.24 R22.1 SD1.2
SDX_VDD: C12.2 J2.4 J2.6 R17.2 R18.2 R19.2 R20.2 R21.2 R22.2 R31.1 SD1.4
USB1_N: R41.2 USB1.2
USB1_P: R42.2 USB1.3
USB_N: R39.2
USB_P: R40.2
pads on no net: IC3.B1 J1.2 J1.3 J1.4 J2.0 J2.2 J2.3 J2.5 J2.9 J2.11 J2.17 J2.21 J2.23 J2.27 J2.29 J2.33 J2.34 J2.35 J2.36 J2.45 J2.46 J2.47 J2.48 J2.51 J2.52 J2.53 J2.54 J2.57 J2.58 J2.59 J2.60 J2.63 J2.64 J2.65 J2.66 J2.69 J2.70 J2.71 J2.72 J2.75 J2.76 J2.77 J2.78 J2.81 J2.83 J2.87 J2.89 J2.93 J2.94 J2.95 J2.96 J2.99 J2.100 J2.101 J2.102 J2.105 J2.106 J2.107 J2.108 J2.112 J2.114 J2.118 J2.120 J2.124 J2.126 J2.128 J2.130 J2.132 J2.135 J2.136 J2.137 J2.138 J2.141 J2.142 J2.143 J2.144 J2.147 J2.148 J2.149 J2.150 J2.153 J2.154 J2.155 J2.156 J2.158 J2.159 J2.160 J2.161 J2.162 J2.166 J2.168 J2.172 J2.174 J2.176 J2.177 J2.178 J2.179 J2.180 SD1.9 U5.4 U5.5 U5.6 U5.7 U5.22 U5.23 U5.24 U5.25 U5.27 USB1.0

## Polygon pours and split planes (outlines as drawn)
3V3 on Power Plane (split plane): 60.899,38.516 60.899,26.428 55.163,26.428 55.163,32.521 55.153,32.571 55.125,32.613 53.601,34.137 53.559,34.165 53.51,34.175 21.252,34.175 21.202,34.165 21.16,34.137 16.639,29.616 16.611,29.574 16.601,29.524 16.601,23.837 15.966,23.202 14.6,23.202 14.117,23.685 14.117,26.705 14.107,26.754 14.079,26.796 9.113,31.762 9.113,32.953 9.113,34.881 10.485,36.253 57.777,36.253 57.827,36.263 57.869,36.291 59.088,37.51 59.116,37.552 59.126,37.601 59.126,38.589 59.482,38.945 60.899,38.945
5V on Power Plane (split plane): 44.63,41.491 44.759,41.466 44.883,41.424 45,41.366 45.109,41.293 45.207,41.207 45.293,41.109 45.366,41 45.424,40.883 45.466,40.759 45.491,40.63 45.5,40.5 45.491,40.37 45.466,40.241 45.424,40.117 45.366,40 45.293,39.891 45.207,39.793 45.109,39.707 45,39.634 44.883,39.576 44.759,39.534 44.63,39.509 44.5,39.5 44.37,39.509 44.241,39.534 44.117,39.576 44,39.634 43.891,39.707 43.793,39.793 43.707,39.891 43.634,40 43.576,40.117 43.534,40.241 43.509,40.37 43.5,40.5 43.509,40.63 43.534,40.759 43.576,40.883 43.634,41 43.707,41.109 43.793,41.207 43.891,41.293 44,41.366 44.117,41.424 44.241,41.466 44.37,41.491 44.5,41.5
5V on Power Plane (split plane): 77.13,3.991 77.259,3.966 77.383,3.924 77.5,3.866 77.609,3.793 77.707,3.707 77.793,3.609 77.866,3.5 77.924,3.383 77.966,3.259 77.991,3.13 78,3 77.991,2.87 77.966,2.741 77.924,2.617 77.866,2.5 77.793,2.391 77.707,2.293 77.609,2.207 77.5,2.134 77.383,2.076 77.259,2.034 77.13,2.009 77,2 76.87,2.009 76.741,2.034 76.617,2.076 76.5,2.134 76.391,2.207 76.293,2.293 76.207,2.391 76.134,2.5 76.076,2.617 76.034,2.741 76.009,2.87 76,3 76.009,3.13 76.034,3.259 76.076,3.383 76.134,3.5 76.207,3.609 76.293,3.707 76.391,3.793 76.5,3.866 76.617,3.924 76.741,3.966 76.87,3.991 77,4
3V9 on Power Plane (split plane): 51.577,16.243 48.216,12.882 14.269,12.882 14.269,16.771 45.966,16.771 46.016,16.781 46.058,16.809 47.937,18.688 47.965,18.73 47.975,18.78 47.975,32.595 48.229,32.849 51.577,32.849
5V on Power Plane (split plane): 3.13,3.991 3.259,3.966 3.383,3.924 3.5,3.866 3.609,3.793 3.707,3.707 3.793,3.609 3.866,3.5 3.924,3.383 3.966,3.259 3.991,3.13 4,3 3.991,2.87 3.966,2.741 3.924,2.617 3.866,2.5 3.793,2.391 3.707,2.293 3.609,2.207 3.5,2.134 3.383,2.076 3.259,2.034 3.13,2.009 3,2 2.87,2.009 2.741,2.034 2.617,2.076 2.5,2.134 2.391,2.207 2.293,2.293 2.207,2.391 2.134,2.5 2.076,2.617 2.034,2.741 2.009,2.87 2,3 2.009,3.13 2.034,3.259 2.076,3.383 2.134,3.5 2.207,3.609 2.293,3.707 2.391,3.793 2.5,3.866 2.617,3.924 2.741,3.966 2.87,3.991 3,4
5V on Power Plane (split plane): 3.13,41.491 3.259,41.466 3.383,41.424 3.5,41.366 3.609,41.293 3.707,41.207 3.793,41.109 3.866,41 3.924,40.883 3.966,40.759 3.991,40.63 4,40.5 3.991,40.37 3.966,40.241 3.924,40.117 3.866,40 3.793,39.891 3.707,39.793 3.609,39.707 3.5,39.634 3.383,39.576 3.259,39.534 3.13,39.509 3,39.5 2.87,39.509 2.741,39.534 2.617,39.576 2.5,39.634 2.391,39.707 2.293,39.793 2.207,39.891 2.134,40 2.076,40.117 2.034,40.241 2.009,40.37 2,40.5 2.009,40.63 2.034,40.759 2.076,40.883 2.134,41 2.207,41.109 2.293,41.207 2.391,41.293 2.5,41.366 2.617,41.424 2.741,41.466 2.87,41.491 3,41.5
5V on Power Plane (split plane): 194 vertices, not listed, extent 0.434,0.434 79.566,56.565
GND on Ground Plane (split plane): 44.63,41.491 44.759,41.466 44.883,41.424 45,41.366 45.109,41.293 45.207,41.207 45.293,41.109 45.366,41 45.424,40.883 45.466,40.759 45.491,40.63 45.5,40.5 45.491,40.37 45.466,40.241 45.424,40.117 45.366,40 45.293,39.891 45.207,39.793 45.109,39.707 45,39.634 44.883,39.576 44.759,39.534 44.63,39.509 44.5,39.5 44.37,39.509 44.241,39.534 44.117,39.576 44,39.634 43.891,39.707 43.793,39.793 43.707,39.891 43.634,40 43.576,40.117 43.534,40.241 43.509,40.37 43.5,40.5 43.509,40.63 43.534,40.759 43.576,40.883 43.634,41 43.707,41.109 43.793,41.207 43.891,41.293 44,41.366 44.117,41.424 44.241,41.466 44.37,41.491 44.5,41.5
GND on Ground Plane (split plane): 3.13,41.491 3.259,41.466 3.383,41.424 3.5,41.366 3.609,41.293 3.707,41.207 3.793,41.109 3.866,41 3.924,40.883 3.966,40.759 3.991,40.63 4,40.5 3.991,40.37 3.966,40.241 3.924,40.117 3.866,40 3.793,39.891 3.707,39.793 3.609,39.707 3.5,39.634 3.383,39.576 3.259,39.534 3.13,39.509 3,39.5 2.87,39.509 2.741,39.534 2.617,39.576 2.5,39.634 2.391,39.707 2.293,39.793 2.207,39.891 2.134,40 2.076,40.117 2.034,40.241 2.009,40.37 2,40.5 2.009,40.63 2.034,40.759 2.076,40.883 2.134,41 2.207,41.109 2.293,41.207 2.391,41.293 2.5,41.366 2.617,41.424 2.741,41.466 2.87,41.491 3,41.5
GND on Ground Plane (split plane): 77.13,3.991 77.259,3.966 77.383,3.924 77.5,3.866 77.609,3.793 77.707,3.707 77.793,3.609 77.866,3.5 77.924,3.383 77.966,3.259 77.991,3.13 78,3 77.991,2.87 77.966,2.741 77.924,2.617 77.866,2.5 77.793,2.391 77.707,2.293 77.609,2.207 77.5,2.134 77.383,2.076 77.259,2.034 77.13,2.009 77,2 76.87,2.009 76.741,2.034 76.617,2.076 76.5,2.134 76.391,2.207 76.293,2.293 76.207,2.391 76.134,2.5 76.076,2.617 76.034,2.741 76.009,2.87 76,3 76.009,3.13 76.034,3.259 76.076,3.383 76.134,3.5 76.207,3.609 76.293,3.707 76.391,3.793 76.5,3.866 76.617,3.924 76.741,3.966 76.87,3.991 77,4
GND on Ground Plane (split plane): 3.13,3.991 3.259,3.966 3.383,3.924 3.5,3.866 3.609,3.793 3.707,3.707 3.793,3.609 3.866,3.5 3.924,3.383 3.966,3.259 3.991,3.13 4,3 3.991,2.87 3.966,2.741 3.924,2.617 3.866,2.5 3.793,2.391 3.707,2.293 3.609,2.207 3.5,2.134 3.383,2.076 3.259,2.034 3.13,2.009 3,2 2.87,2.009 2.741,2.034 2.617,2.076 2.5,2.134 2.391,2.207 2.293,2.293 2.207,2.391 2.134,2.5 2.076,2.617 2.034,2.741 2.009,2.87 2,3 2.009,3.13 2.034,3.259 2.076,3.383 2.134,3.5 2.207,3.609 2.293,3.707 2.391,3.793 2.5,3.866 2.617,3.924 2.741,3.966 2.87,3.991 3,4
GND on Ground Plane (split plane): 194 vertices, not listed, extent 0.434,0.434 79.566,56.565

## Other copper
Solder Side:
  region net NetF1_2: 9.169,49.97 12.065,49.97 12.192,49.843 12.192,47.328 12.116,47.252 12.116,47.176 9.195,47.176
Ground Plane (plane layer: these items are gaps in the copper):
  circle w2: c44.5,40.5 r2
  circle w2: c3,40.5 r2
  circle w2: c77,3 r2
  circle w2: c3,40.5 r2
  circle w2: c3,3 r2
Power Plane (plane layer: these items are gaps in the copper):
  circle w2: c44.5,40.5 r2
  circle w2: c77,3 r2
  circle w2: c3,40.5 r2
  circle w2: c3,3 r2
  lines w0.254: 14.14,12.786 14.173,12.752 48.269,12.752 51.706,16.189 51.706,32.979 48.176,32.979 47.846,32.648 47.846,18.78 45.966,16.9 14.14,16.9 14.14,12.815 ; 8.984,31.709 13.987,26.705 13.987,23.631 14.546,23.073 16.019,23.073 16.731,23.784 16.731,29.524 21.252,34.045 53.51,34.045 55.034,32.521 55.034,26.324 55.059,26.298 61.028,26.298 61.028,38.516 61.028,39.075 59.428,39.075 58.996,38.643 58.996,37.601 57.777,36.382 10.431,36.382 8.984,34.934 8.984,32.953 8.984,31.709

## Silkscreen, mask and mechanical layers (free items; w line width, h text height)
Top Overlay:
  text "c" at 21,2.5 h12
Bottom Overlay:
  text "'.ModifiedDate'" at 78.678,16.694 h2 r90
Board Outline:
  lines w0.15: 0,3 ccw(c3,3) 3,0 ; 0,54 cw(c3,54) 3,57 44.5,57 ; 44.37,57 77,57 cw(c77,54) 80,54 ; 77,0 ccw(c77,3) 80,3
  lines w0.152: 0,3 0,54 ; 3,0 77,0 ; 80,3 80,54
Dimensions:
  lines w0.127: -64.5,-4.74 -59.42,-4.74 ; -64.5,43.52 -59.42,43.52 ; -64.5,91.78 -59.42,91.78 ; 8.525,-53 8.525,-47.92 ; 8.525,134.96 8.525,140.04 ; 81.55,-53 81.55,-47.92 ; 81.55,134.96 81.55,140.04 ; 108.22,-32.68 222.52,-32.68 ; 108.22,-25.06 146.32,-25.06 ; 146.32,-47.92 146.32,-32.68 146.32,-17.44 ; 154.575,-53 154.575,-47.92 ; 154.575,134.96 154.575,140.04 ; 199.66,-47.92 199.66,-32.68 ; 222.52,-4.74 227.6,-4.74 ; 222.52,43.52 227.6,43.52 ; 222.52,91.78 227.6,91.78 ; 108.22,-47.92 72.66,-47.92 72.66,-17.44 108.22,-17.44 ; 108.22,-47.92 108.22,-17.44 ; 108.22,-47.92 222.52,-47.92 ; 108.22,-17.44 146.32,-17.44 ; 146.32,-17.44 222.52,-17.44 222.52,-47.92 ; 222.52,-47.92 -59.42,-47.92 -59.42,134.96 222.52,134.96 222.52,-47.92 ; -64.5,-53 227.6,-53 227.6,140.04 -64.5,140.04 -64.5,-53
  lines w0.152: 108.22,-40.3 146.32,-40.3 ; 199.66,-40.3 222.52,-40.3
  text "1" at -28.254,136.611 h1.78
  text "2" at 44.39,136.611 h1.78
  text "3" at 117.542,136.611 h1.78
  text "4" at 190.44,136.611 h1.78
  text "A" at -62.595,113.599 h1.78
  text "A" at 224.425,113.599 h1.78
  text "B" at -62.595,65.542 h1.78
  text "B" at 224.425,65.542 h1.78
  text "C" at -62.595,17.028 h1.78
  text "C" at 224.425,17.028 h1.78
  text "ENGINEER:" at 109.49,-19.98 h1.14
  text "TITLE:" at 147.59,-19.98 h1.14
  text "Lei HongLun" at 123.079,-23.282 h3.05
  text "PCB DESIGNER:" at 109.49,-27.473 h1.14
  text "Lei HongLun" at 123.079,-28.87 h3.05
  text "D" at -62.595,-30.978 h1.78
  text "D" at 224.425,-30.978 h1.78
  text "Tel:133 4023 2618" at 122.317,-31.918 h2.03
  text "'.Item'" at 146.32,-32.68 h7.62
  text "DATE:" at 109.49,-35.22 h1.14
  text "VersionControl_RevNumber:" at 147.59,-35.22 h1.14
  text "REV:" at 200.93,-35.22 h1.14
  text ".PRINT_DATE" at 108.22,-38.369 h2.54
  text "'.ItemRevision'" at 199.66,-40.3 h4.57
  text "FILE NAME:" at 109.49,-42.84 h1.14
  text "SCALE:" at 200.93,-42.84 h1.14
  text "'.VersionControl_RevNumber'" at 147.971,-44.745 h2.5
  text "c" at 72.66,-47.92 h10.16
  text ".PCB_FILE_NAME_NO_PATH" at 108.22,-47.92 h2.54
  text "1" at -28.254,-51.349 h1.78
  text "2" at 44.39,-51.349 h1.78
  text "3" at 117.542,-51.349 h1.78
  text "4" at 190.44,-51.349 h1.78

## Dimensions
3,0 to 3,57 on Bottom Designator (Mech16)
80,3 to 0,3 on Bottom Designator (Mech16)
17.2,58.1 to 12,58.1 on Bottom Designator (Mech16)
43,57.9 to 45.692,58.1 on Bottom Designator (Mech16)

## Text inside footprints (layer, text, board x,y; h text height)
J2: Top Overlay "1" at 72.666,36.558 h1 r180; Top Overlay "200" at 10.69,26.449 h1 r180
SD1: Bottom Overlay "Cd" at 63.231,42.682 h0.76 r270; Bottom Overlay "8" at 64.578,43.241 h0.76 r180; Bottom Overlay "7" at 65.695,43.266 h0.76 r180; Bottom Overlay "6" at 66.762,43.266 h0.76 r180; Bottom Overlay "5" at 67.829,43.266 h0.76 r180; Bottom Overlay "4" at 68.896,43.291 h0.76 r180; Bottom Overlay "3" at 70.089,43.291 h0.76 r180; Bottom Overlay "2" at 71.156,43.291 h0.76 r180; Bottom Overlay "1" at 72.248,43.317 h0.76 r180
USB1: Top Overlay "USB" at 55.959,48.867 h1.27 r180